# Altium PCB PCB_Main_Board_v2.0.PcbDoc (part 4 of 5)
Units mil, origin at the board's own origin, x right, y up, seen from the top; angles counter-clockwise.
Board outline 1967.5 x 1574.8 mil, 4 copper layers (Top Layer, Mid Layer 1, Mid Layer 2, Bottom Layer), stack 61.811 mil thick; 225 components, 129 nets, 854 pads, 286 vias.
Unrouted connection lines stored in the file: 2.
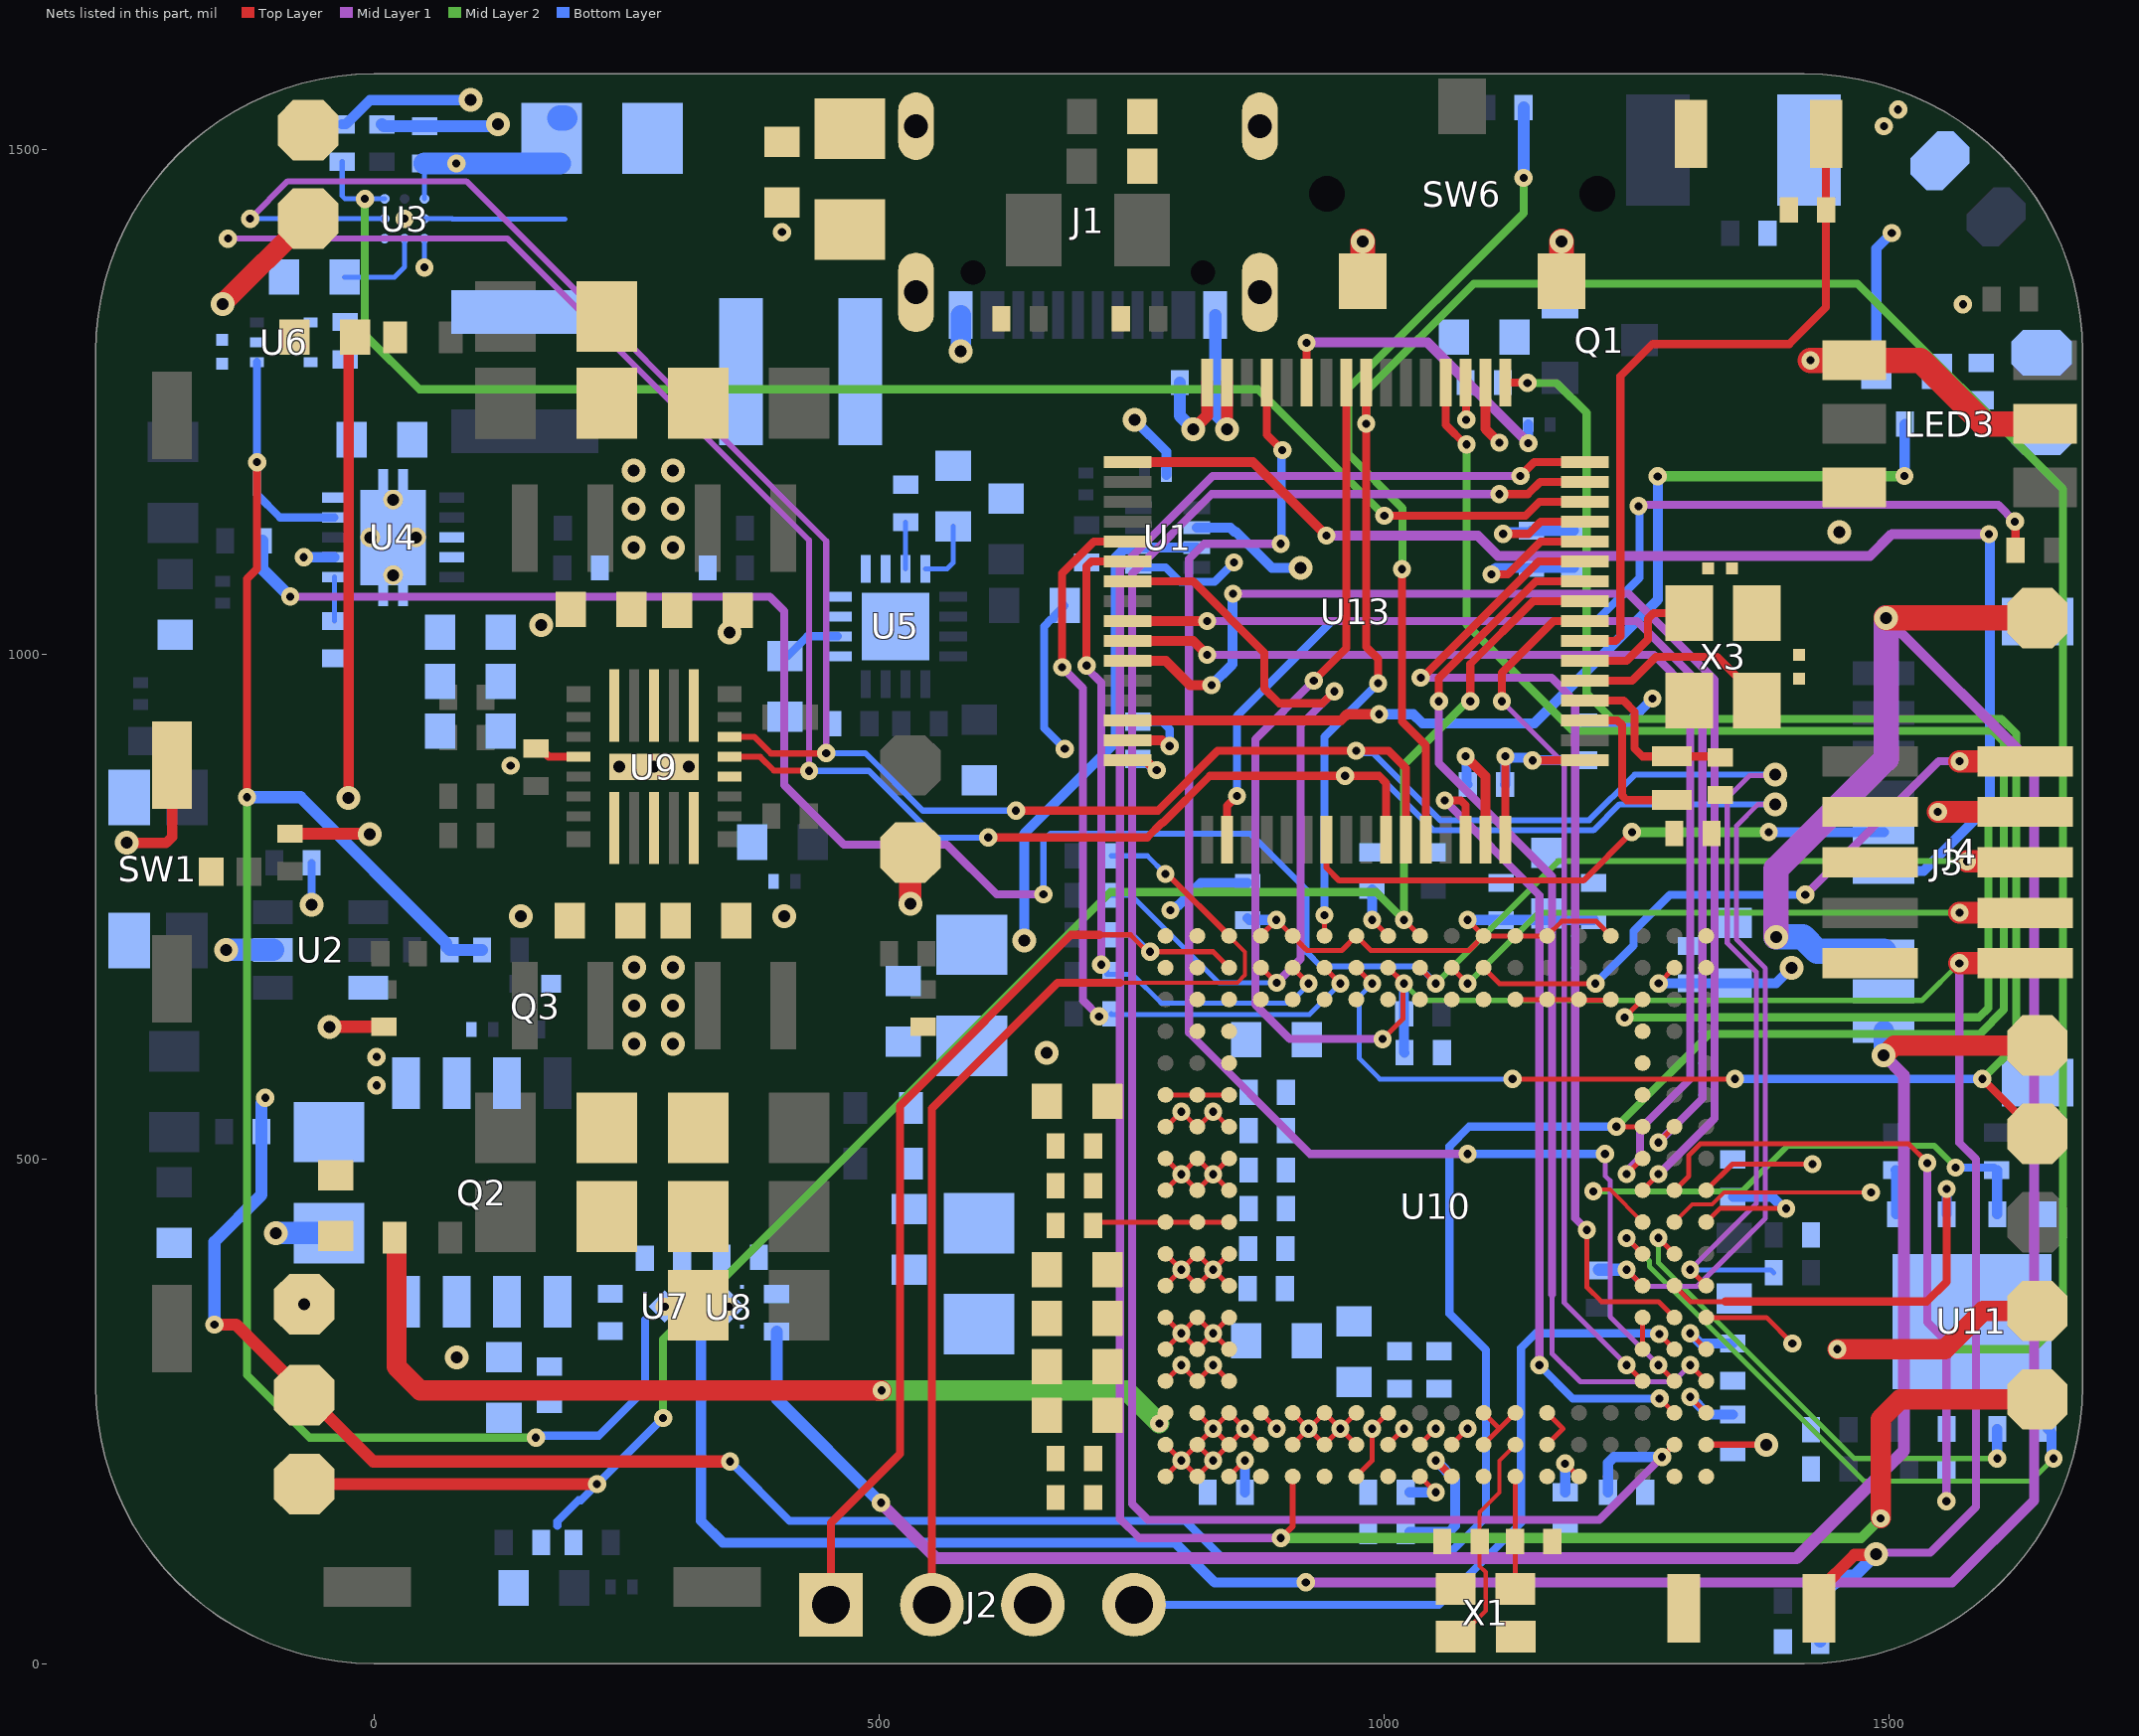
[diagram p4: the nets of this part, all layers, seen from the top]

## Via types
v1: diameter 18, hole 8, Top Layer to Bottom Layer, tented both sides, 224 vias
v2: diameter 23.62, hole 11.81, Top Layer to Bottom Layer, tented both sides, 59 vias
v3: diameter 19.68, hole 11.81, Top Layer to Bottom Layer, tented both sides, 3 vias

## Nets (pads, with @x,y where several pads share a name; then routed paths per layer and width w, separated by ;. In a path a pad name is that pad's centre, name@x,y a point inside that pad or via, vN(x,y) a via of type N, cw(c..) or ccw(c..) an arc to the next point about the centre after c; other vN are vias at no path point) (continued)
AR_1P0_RF1: C24.2 C25.2 C61.2 C62.2 C63.2 C64.2 FB3.2 U10.J16 U10.J17 U10.J18 | length 136.1
  Top Layer w5: C64.2@711.97,434.26 715.22,437.51 U10.J18@783.75,437.51 U10.J17@815.24,437.51 U10.J16@846.74,437.51
  other v2: 665.94,604.99
AR_1P0_RF2: C31.2 C32.2 C55.2 C56.2 C57.2 C65.2 C66.2 C67.2 C68.2 FB4.2 U10.G16 U10.G17 U10.G18 U10.H16 U10.H17 U10.H18 | length 178.2
  Top Layer w5: U10.G18@783.75,374.52 v1(799.5,390.27) ; U10.H18@783.75,406.01 v1(799.5,390.27) ; U10.G16@846.74,374.52 v1(830.99,390.27) ; U10.H16@846.74,406.01 v1(830.99,390.27) ; v1(799.5,390.27) U10.H17@815.24,406.01 v1(830.99,390.27) ; v1(799.5,390.27) U10.G17@815.24,374.52 v1(830.99,390.27)
AR_1P2: C30.2 C79.2 C80.2 C81.2 C82.2 C83.2 C84.2 C85.2 C86.2 FB5.2 U10.A5 U10.C1 U10.E1 U10.J1 U10.V4 U10.V6 U10.V7 U10.V8 U10.V12 U10.V14 U10.V15 | length 1358.9
  Top Layer w5: U10.V15@878.24,720.98 878.24,721.21 893.52,736.49 v1(893.52,736.72) 893.75,736.72 923.87,706.6 958.35,706.6 U10.V12@972.72,720.98 987.1,706.6 1084.34,706.6 U10.V8@1098.71,720.98 U10.V7@1130.2,720.98 U10.V6@1161.7,720.98 1176.08,735.35 1210.32,735.35 U10.V4@1224.69,720.98 ; v1(1082.96,736.72) U10.V8@1097.49,722.2 ; v1(1179.5,198.25) 1179.99,198.25 1192.71,185.54 U10.A5@1193.2,185.54 ; v1(1303.43,264.28) U10.C1@1319.18,248.53 ; v1(1303.43,327.28) U10.E1@1319.18,311.53 ; U10.J1@1319.18,437.51 1319.33,437.51 1332.7,450.89 v1(1398.22,450.89)
  Top Layer w10: v2(-25.2,857.49) -25.2,1307.56 C30.2@-18.76,1314
  Bottom Layer w10: C83.2@865,738.5 866.78,736.72 v1(893.52,736.72) ; v1(1082.96,736.72) C79.2@1207.84,736.72 ; C86.2@1179.5,169.8 v1(1179.5,198.25) ; v1(1303.43,264.28) 1320.93,246.79 C85.2@1345.5,246.79 ; v1(1303.43,327.28) 1313.43,317.28 C84.2@1345.5,317.28 ; C80.2@1345.5,462.5 1384.44,462.5 1396.06,450.89 v1(1398.22,450.89)
AR_1V4_APLL: C58.2 U10.A10 | length 48.3
  Top Layer w5: U10.A10@1035.72,185.54 v1(1051.46,169.8)
  Bottom Layer w10: C58.2@1025.47,169.8 v1(1051.46,169.8)
AR_1V4_SYNTH: C60.2 U10.A9 | length 142.2
  Top Layer w8: v1(1051.47,201.29) U10.A9@1067.21,185.54
  Bottom Layer w10: C60.2@1025.47,130.79 1064.6,130.79 1070.46,136.65 1070.46,182.3 v1(1051.47,201.29)
AR_1V8: C22.2 C23.2 C69.2 C70.2 C71.2 C72.2 C73.2 C74.2 C75.2 C76.2 C77.2 C78.2 C90.2 C91.2 C92.2 FB2.2 U10.A12 U10.B1 U10.C11 U10.C15 U10.C18 U10.F1 U10.K1 U10.M16 U10.M17 U10.M18 U10.U2 U10.V11 | length 1648.1
  Top Layer w5: C73.2@726.47,246.26 C73.2@728.74,248.54 ; v1(777.61,238.04) 777.61,240.22 783.75,246.35 U10.C18@783.75,248.53 ; U10.M18@783.75,532 784.69,532 v1(799.5,546.75) v1(799.5,546.75) 799.55,546.75 814.3,532 U10.M17@815.24,532 ; U10.M17@816.19,532 v1(830.99,546.75) ; v1@831.05,546.75 U10.M16@845.8,532 ; U10.C15@878.24,248.53 v1(893.98,232.79) ; U10.A12@972.72,185.54 988.47,201.29 v1(988.47,232.79) U10.C11@1004.22,248.53 ; v1(988.47,736.72) U10.V11@1004.22,720.98 ; v1@1271.94,673.73 v1(1272.07,673.87) U10.U2@1287.68,689.48 ; U10.F1@1319.18,343.02 1378.76,343.02 v1(1404.5,317.28) ; U10.K1@1319.18,469.01 1345.11,494.94 v1(1424.47,494.94)
  Top Layer w6: U10.B1@1319.18,217.04 v2(1378.76,217.04)
  Top Layer w20: FB2.2@20.44,422 22.25,420.19 22.25,294.25 45.77,270.73 v1(502.73,270.73)
  Mid Layer 2 w20: v1@498.73,270.73 744.92,270.73 v1(777.61,238.04)
  Bottom Layer w10: C91.2@988.22,766.78 988.47,766.53 v1(988.47,736.72) ; v1@1272.21,674 C92.2@1303.43,674 C90.2@1347,674 1388.37,674 v2(1403.85,689.48)
  Bottom Layer w22: v2(-97.14,426.64) C22.2@-44.5,426.64
AR_BSS_LOGGER: U10.D3 U13.8 | length 862.8
  Top Layer w5: v1(1240.44,295.78) U10.D3@1256.19,280.03
  Top Layer w8: v1(1116.79,953.35) 1116.79,981.68 1167.88,1032.77 U13.8@1199,1032.77
  Mid Layer 1 w5: v1(1116.79,953.35) 1178.63,891.51 1178.63,357.6 v1(1240.44,295.78)
AR_CS1: U10.C2 U13.62 | length 810.5
  Top Layer w5: v1@1271.29,264.28 1272.79,262.78 1273.12,262.78 1287.36,248.54 U10.C2@1287.68,248.53
  Top Layer w8: v1(1060.21,855.1) 1076.2,855.1 1080.89,850.41 U13.62@1080.89,816.24
  Mid Layer 1 w8: v1(1060.21,855.1) 1154,761.3 v1(1154,295.78)
  Bottom Layer w8: v1(1154,295.78) 1187,262.78 v1(1272.95,262.78)
AR_HOSTINTR1: R37.1 U10.B2 U13.15 | length 2071.8
  Top Layer w5: v1(1275.42,204.77) U10.B2@1287.68,217.04 U10.B2@1291.17,220.52
  Top Layer w8: v1(1114.35,1158.47) 1142.6,1158.47 1154.7,1170.57 U13.15@1199,1170.57
  Mid Layer 1 w8: v1(1114.35,1158.47) 829.35,1158.47 750.57,1079.69 750.57,712.68 750.57,158.45 766.47,142.55 1213.2,142.55 v1(1275.42,204.77)
  Bottom Layer w10: R37.1@1221.94,169.8 1221.94,198.91 1227.8,204.77 v1(1275.42,204.77)
AR_MCUCLKOUT: TP15.1 U10.V13 U13.24 | length 2697.3
  Top Layer w5: U10.V13@941.23,720.98 v1(941.23,741.5)
  Top Layer w8: U13.24@982.47,1268.99 v1(982.47,1228.26) 982.47,1007.18 994.19,995.46 v1(994.19,971.1)
  Top Layer w20: v1(1449,311.53) 1555.53,311.53 1593.48,349.48 TP15.1@1647.09,349.48
  Mid Layer 2 w8: v1(982.47,1228.26) 982.47,1260.47 1089,1367 1468.95,1367 1672.31,1163.64 1672.31,340.79 1643.05,311.53 v1(1449,311.53)
  Bottom Layer w8: v1(941.23,741.5) 941.23,918.14 v1(994.19,971.1)
AR_MISO1: U10.D1 U13.10 | length 1077.2
  Top Layer w5: v1(1303.43,295.78) U10.D1@1319.18,280.03
  Top Layer w8: v1(1054.44,953.35) 1054.44,976.05 1150.53,1072.14 U13.10@1199,1072.14
  Mid Layer 1 w5: 1166.63,366.08 1166.63,307.14 1194.48,279.28 1286.93,279.28 v1(1303.43,295.78)
  Mid Layer 1 w8: v1(1054.44,953.35) 1054.44,891.99 1166.63,779.81 1166.63,366.08
AR_MOSI1: U10.F2 U13.11 | length 1057
  Top Layer w5: v1(1201.07,429.64) 1201.07,373.08 1215.38,358.77 1271.94,358.77 U10.F2@1287.68,343.02
  Top Layer w8: v1(1036.45,976.67) 1038.1,976.67 1153.25,1091.83 U13.11@1199,1091.83
  Mid Layer 1 w8: v1(1036.45,976.67) 1165.93,976.68 1189.43,953.19 1189.43,441.28 v1(1201.07,429.64)
AR_MSS_LOGGER: J2.4 U10.E2 | length 754.8
  Top Layer w5: v1@1272.51,327.28 1272.69,327.1 v1(1272.69,326.52) U10.E2@1287.68,311.53
  Bottom Layer w8: J2.4@752.5,58.4 1054.6,58.4 1135.77,139.58 1135.77,312.71 1150.34,327.28 v1@1272.51,327.28
AR_NERR_OUT: R32.1 U10.U15 U13.39 | length 814.7
  Top Layer w5: U10.U15@878.24,689.48 878.52,689.48 893.52,674.48 v1(893.81,674.48)
  Top Layer w8: U13.39@746.04,1071.94 U13.39@746.24,1072.14 811.07,1072.14 881.76,1001.45 881.76,965.96 896.42,951.3 939.16,951.3 v1(951.03,963.17)
  Mid Layer 1 w8: v1(893.81,674.48) 917.5,698.18 917.5,929.65 v1(951.03,963.17)
  Bottom Layer w5: R32.1@730,761.15 749.96,761.15 836.63,674.48 v1(893.81,674.48)
AR_NERRIN: R30.1 U10.U14 U13.38 | length 700.1
  Top Layer w5: U10.U14@909.73,689.48 v1(925.48,673.73) v1@925.98,673.23
  Top Layer w8: v1@705.5,988.87 705.5,1087.14 710.19,1091.83 U13.38@746.24,1091.83
  Mid Layer 1 w8: v1(705.62,988.75) 705.62,986.04 720,971.66 v1(720,692.48)
  Bottom Layer w5: v1(720,692.48) 723.5,692.48 725.44,690.54 725.44,682.88 750.98,682.88 779.35,654.5 907.25,654.5 v1@925.98,673.23
AR_NRST: C46.2 C47.2 J3.10 R28.1 R31.1 SW2.2 U10.U11 U13.25 | length 3071
  Top Layer w5: v1(998.79,618.78) 1018.79,638.78 v1@1018.79,674.91 ; U10.U11@1004.22,689.48 v1@1018.79,674.91 ; v1(1019.97,673.73) v1@1018.79,674.91 ; SW2.2@1430.93,41.78 SW2.2@1430.93,55 ; v1(1569.79,693.85) v1@1570,693.85
  Top Layer w8: v1(930.58,973.72) 962.78,1005.91 U13.25@962.78,1268.99
  Top Layer w12: SW2.2@1430.93,55 1430.93,72.72 1465.99,107.78 1486.6,107.78 v2(1487.36,108.53)
  Top Layer w22: v1@1570,693.85 J3.10@1634.83,693.85
  Mid Layer 1 w8: v1(930.58,973.72) 872.61,915.74 872.61,652.95 906.79,618.78 v1(998.79,618.78) ; v2(1487.36,108.53) 1488.82,110 1541,110 1586.17,155.17 1586.17,499.82 1569.79,516.2 v1(1569.79,693.85)
  Mid Layer 2 w4: v1(1019.97,673.73) 1035.97,657.73 1533.67,657.73 1533.88,657.73 v1@1570,693.85
  Mid Layer 2 w5: v1@1019.79,673.78 1036.79,656.78 1532.72,656.78 1533.67,657.73 v1(1569.79,693.85)
  Bottom Layer w5: v1@1019.79,673.78 1019.97,673.6 1020.17,673.4 R28.1@1020.17,643.64
  Bottom Layer w10: v1(1019.97,673.73) 1019.97,673.6 1019.97,605.69 C46.2@1020.46,605.2
  Bottom Layer w12: C47.2@1432,22 1432,61.47 1435,64.47 1435,68.5 1453.85,87.35 1466.17,87.35 v2(1487.36,108.53)
AR_OSC_CLKOUT: TP11.1 U10.A14 U13.16 | length 2541.9
  Top Layer w6: v1(898,124.55) 909.73,136.28 U10.A14@909.73,185.54
  Top Layer w8: v1(1135.15,1176.47) 1148.8,1190.13 1198.87,1190.13 U13.16@1199,1190.25
  Top Layer w20: v1(1492,144) 1492,242.48 1511.37,261.85 TP11.1@1647.09,261.85
  Mid Layer 1 w8: v1(898,124.55) 757.8,124.55 738.57,143.78 738.57,1084.66 830.38,1176.47 v1(1135.15,1176.47)
  Mid Layer 2 w10: v1(898,124.55) 1472.55,124.55 v1(1492,144)
AR_PMIC_CLKOUT: R44.1 R45.2 TP14.1 U10.V10 U13.9 | length 1890
  Top Layer w5: v1(1019.97,736.72) U10.V10@1035.72,720.98
  Top Layer w8: v1(1085.52,953.35) 1085.52,990.16 1147.82,1052.46 U13.9@1199,1052.46
  Top Layer w12: TP14.1@-69,178 v1@222.14,178
  Mid Layer 2 w8: v1(286.29,243.49) 286.29,321.42 729.14,764.28 992.41,764.28 v1(1019.97,736.72) 1019.97,890.45 1082.52,953 v1@1082.52,953.35
  Bottom Layer w8: 181.5,136.75 181.5,141 202.5,162 204.8,162 v1(286.29,243.49)
  other v1: 220.8,178
AR_QSPI_CLK: U10.H2 U11.6 | length 491.9
  Top Layer w5: v1(1271.94,421.76) U10.H2@1287.68,406.01
  Mid Layer 2 w5: v1(1271.94,421.76) 1271.94,397.09 1465.72,203.31 v1(1607.31,203.31)
  Bottom Layer w10: v1(1607.31,203.31) U11.6@1607.31,232.63
AR_QSPI_CS: R42.1 U10.J2 U11.1 | length 251.3
  Top Layer w4: U10.J2@1287.68,437.51 1305.31,455.13 1324.93,455.13 1336.68,466.89 v1(1482.31,466.89)
  Bottom Layer w10: R42.1@1506.64,489.08 1507.31,489.08 U11.1@1507.31,445.23
AR_QSPI_D0: U10.H3 U11.5 | length 588.7
  Top Layer w5: v1(1240.43,421.55) 1240.54,421.55 1256.07,406.02 U10.H3@1256.19,406.01
  Mid Layer 2 w5: v1(1240.43,421.55) 1262.94,399.04 1262.94,393.36 1475.3,181 1640.69,181 v1(1663,203.31)
  Bottom Layer w10: U11.5@1657.31,232.63 1661.17,228.77 1661.17,207.31 1663,205.47 v1(1663,203.31)
AR_QSPI_D1: U10.G2 U11.2 | length 401.3
  Top Layer w5: U10.G2@1287.68,374.52 1303.43,358.77 1338,358.77
  Top Layer w8: 1338,358.77 1537.77,358.77 1557.31,378.31 v1(1557.31,470.31)
  Bottom Layer w10: U11.2@1557.31,445.23 v1(1557.31,470.31)
AR_QSPI_D2: R41.1 U10.J3 U11.3 | length 534.7
  Top Layer w4: v1@1207.43,469.99 1207.72,469.7 1224,469.7 U10.J3@1256.19,437.51
  Mid Layer 2 w6: v1(1207.43,467.99) 1354.66,467.99 1399.67,513 1545.04,513 1566.17,491.88 v1(1566.17,491.54)
  Bottom Layer w4: R41.1@1604.33,491.54 R41.1@1606.78,489.08
  Bottom Layer w8: v1(1566.17,491.54) R41.1@1604.33,491.54
  Bottom Layer w10: R41.1@1606.78,489.08 1607.31,489.08 U11.3@1607.31,445.23
AR_QSPI_D3: R40.1 U10.K2 U11.7 | length 632.5
  Top Layer w5: U10.K2@1287.68,469.01 1288.04,469.01 1302.06,483.03 1302.06,503.71 1313.23,514.88 1519.76,514.88 1538,496.63 v1(1538,496)
  Mid Layer 1 w8: v1(1538,496) 1538,338.32 1557,319.32 v1(1557,161)
AR_RS232RX: J2.2 R35.1 U10.V16 | length 1050.8
  Top Layer w4: 738.57,674.48 854.82,674.48 862.49,682.15 862.49,705.23 U10.V16@846.74,720.98
  Top Layer w6: v1(783.75,782.28) 785.44,782.28 U10.V16@846.74,720.98
  Top Layer w8: J2.2@552.5,58.91 552.5,550.09 676.9,674.48 738.57,674.48
  Bottom Layer w5: R35.1@730,800.28 765.75,800.28 v1(783.75,782.28)
AR_RS232TX: J2.1 R36.1 U10.U16 | length 979.1
  Top Layer w5: 718.41,722 749,722 765.77,705.23 v1(768.57,705.23) ; v1@767,705.25 830.97,705.25 U10.U16@846.74,689.48
  Top Layer w8: J2.1@452.5,58.4 452.5,139.5 520.93,207.93 520.93,552.66 690.27,722 718.41,722
  Bottom Layer w5: R36.1@730,722 751.75,722 v1@768.52,705.23
AR_SCL: R33.1 U3.A3 U9.5 U10.G3 U13.58 | length 2979.6
  Top Layer w5: v1(1240.44,390.27) U10.G3@1256.19,374.52
  Top Layer w6: U9.5@352.01,898.25 382.32,898.25 395.91,884.67 430.51,884.67 v1(430.81,884.37)
  Top Layer w8: v1(608.22,818.41) 765.71,818.41 780.31,833.01 781.2,833.01 827.67,879.48 v1(961.55,879.48) 995.17,879.48 1002.15,872.5 U13.58@1002.15,816.24
  Mid Layer 1 w5: v1(1240.44,390.27) 1256.94,373.77 1310.27,373.77 1377.8,441.3 1377.8,688.86 1349,717.67 1349,829.81 1370.52,851.33 v2(1387.71,851.33)
  Mid Layer 1 w6: v1(-144.61,1411.59) 132.15,1411.59 430.81,1112.93 v1(430.81,884.37)
  Bottom Layer w5: v1(-144.61,1411.59) U3.A3@10.59,1411.59
  Bottom Layer w6: v1(430.81,884.37) 489.9,884.37 555.86,818.41 v1(608.22,818.41) ; v1(961.55,879.48) 995.17,879.48 1049.14,825.51 1207.46,825.51 1233.28,851.33 v2(1387.71,851.33)
  Bottom Layer w12: R33.1@1213.08,390.27 v1(1240.44,390.27)
AR_SDA: R34.1 U3.A2 U9.6 U10.G1 U13.59 | length 3012.9
  Top Layer w4: U13.59@1021.84,816.24 1019.97,818.1 U13.59@1021.84,819.97
  Top Layer w5: v1(1303.43,390.27) U10.G1@1319.18,374.52
  Top Layer w6: U9.6@352.01,917.94 376.78,917.94 393.05,901.67 447.46,901.67 v1(447.81,902.02)
  Top Layer w8: v1(635.66,845.01) 776.23,845.01 835.45,904.23 v1(972.45,904.23) 1004.81,904.23 1021.84,887.2 U13.59@1021.84,819.97
  Mid Layer 1 w5: v1(1303.43,390.27) 1368.8,455.64 1368.8,685.14 1340,713.94 1340,857.56 1362.12,879.68 v2@1387.71,879.68
  Mid Layer 1 w6: v1(-122.68,1431.28) -85.49,1468.46 91.35,1468.46 447.81,1112 v1(447.81,902.02)
  Bottom Layer w5: v1(-122.68,1431.28) U3.A2@10.59,1431.28 ; v1(1303.43,390.27) 1383,390.27 R34.1@1386,387.27
  Bottom Layer w6: v1(447.81,902.02) 486.39,902.02 543.4,845.01 v1(635.66,845.01) ; v1(972.45,904.23) 974.75,901.94 989.32,901.94 1055.75,835.51 1203.32,835.51 1248.49,880.68 v2(1387.71,880.68)
AR_SPICLK1: U10.D2 U13.29 | length 1448.3
  Top Layer w5: v1(1271.94,295.78) U10.D2@1287.68,280.03
  Top Layer w8: U13.29@884.04,1268.99 884.04,1217.48 v1(899.42,1202.11)
  Mid Layer 1 w5: v1(1219,505) 1219,483.33 1223.93,478.4 1223.93,343.79 v1(1271.94,295.78)
  Mid Layer 1 w8: v1(897.82,1109.26) 821.89,1109.26 806.98,1094.36 806.98,625.01 927,505 v1(1082.96,505)
  Bottom Layer w8: v1(897.82,1109.26) 898.62,1110.06 898.62,1201.31 v1(899.42,1202.11) ; v1(1082.96,505) v1(1219,505)
AR_SYNC_IN: TP12.1 U10.U12 U13.17 | length 1974.5
  Top Layer w5: U10.U12@972.72,689.48 v1(988.47,673.73) ; v1@1125.58,579.24 v1(1347.69,579.24) ; v1@1141.8,1268.99 v1(1142.15,1268.64)
  Top Layer w8: U13.17@1120.26,1268.99 v1@1141.8,1268.99 ; v1(1592.58,579.24) TP12.1@1647.09,524.73
  Mid Layer 2 w8: v1(1142.15,1268.64) 1171.03,1268.64 1200.79,1238.89 1200.79,960.9 1225.81,935.88 1611.43,935.88 1626,921.31 1626,612.66 v1(1592.58,579.24)
  Bottom Layer w5: v1(988.47,673.73) 975.72,660.98 975.72,599.51 995.98,579.24 v1(1127.43,579.24)
  Bottom Layer w8: v1(1347.69,579.24) v1(1592.58,579.24)
AR_SYNC_OUT: R49.2 TP13.1 U10.M3 U13.20 | length 3724.7
  Top Layer w5: v1(1230.26,532) U10.M3@1256.19,532
  Top Layer w8: U13.20@1061.21,1268.99 1061.21,1227.12 1080.65,1207.69 v1(1081.79,1207.69)
  Top Layer w12: v1(-158,336) -136.5,336 -0.9,200.4 v1(352.51,200.4)
  Mid Layer 2 w8: v1(1081.79,1207.69) 1081.79,1029.24 1187.15,923.88 1603.03,923.88 1614,912.91 1614,647.88 1590.12,624 1322.26,624 v1(1230.26,532)
  Bottom Layer w8: v1(352.51,200.4) 411.41,141.5 803.33,141.5 840.28,104.55 1060.28,104.55 1100.96,145.24 1100.96,310.85 1064.96,346.85 1064.96,512.46 1084.51,532 v1(1230.26,532)
  Bottom Layer w12: v1(-158,336) -158,417.93 -111.5,464.43 R49.2@-111.5,527 -111.5,555.28 -107.76,559.02 v1(-107.76,560.64)
AR_TCK: J3.4 U10.T3 | length 719.2
  Top Layer w5: v1(1238.44,640.24) U10.T3@1256.19,657.98
  Top Layer w22: v1(1548.53,843.85) J3.4@1634.83,843.85
  Mid Layer 2 w5: 1323.65,640.24 1323.69,640.28
  Mid Layer 2 w8: v1(1238.44,640.24) 1323.65,640.24 ; 1323.69,640.28 1589.43,640.28 1598.65,649.5 1598.65,834.07 1588.88,843.85 v1(1548.53,843.85) v1@1543.53,843.85
AR_TDI: J3.8 U10.U9 | length 603.3
  Top Layer w5: U10.U9@1067.21,689.48 v1(1082.96,673.73)
  Top Layer w22: v1(1570,743.85) J3.8@1634.83,743.85
  Mid Layer 2 w6: v1(1082.96,673.73) 1153.08,743.85 1410.14,743.85 1410.27,743.72 ; 1410.27,743.85 1424.35,743.85 ; 1424.35,743.72 1424.48,743.85 v1(1570,743.85)
AR_TDO_SOP0: J3.6 R55.2 U10.U10 | length 2234.4
  Top Layer w5: U10.U10@1035.72,689.48 v1(1051.47,673.73)
  Top Layer w22: v1(1577.4,794.89) 1633.79,794.89 J3.6@1634.83,793.85
  Mid Layer 1 w8: v1(-83,1057) 391.99,1057 406.31,1042.68 406.31,870.43 465.26,811.49 567.29,811.49 616.58,762.2 v1(662.81,762.2)
  Mid Layer 2 w6: v1(1051.47,673.73) 1172.62,794.89 v1(1577.4,794.89)
  Bottom Layer w6: v1(662.81,762.2) 662.81,815.17 669.96,822.32 867.63,822.32 923.47,766.48 923.47,704.63 937.36,690.73 993.85,690.73 993.9,690.78 1034.42,690.78 v1(1051.47,673.73)
  Bottom Layer w12: R55.2@-110.43,1112.41 -110.43,1084.1 -83.33,1057 v1(-83,1057)
AR_TMS: J3.2 U10.U8 | length 641.4
  Top Layer w5: U10.U8@1098.71,689.48 1114.46,673.73 v1(1209.51,673.73)
  Top Layer w22: v1(1570,893.85) J3.2@1634.83,893.85
  Mid Layer 1 w8: v1@1417.86,762.28 1549.43,893.85 v1(1570,893.85)
  Bottom Layer w8: v1(1209.51,673.73) 1247.36,711.58 1247.36,725.79 1283.29,761.72 v1(1417.31,761.72)
AR_VBGAP: C59.2 U10.A16 | length 53.8
  Top Layer w5: U10.A16@846.74,185.54 v1(862.49,201.29)
  Bottom Layer w10: C59.2@862.49,169.8 v1(862.49,201.29)
AR_WARMRST: R29.1 U10.U13 U13.37 | length 794.7
  Top Layer w5: U10.U13@941.23,689.48 v1(956.98,673.73)
  Top Layer w8: v1(681.41,986.93) 681.41,1080.18 712.74,1111.51 U13.37@746.24,1111.51
  Mid Layer 1 w8: v1(681.41,986.93) 702,966.34 702,657.17 v1(718,641.17)
  Bottom Layer w5: R29.1@730,643.74 730,642.98 926.23,642.98 v1(956.98,673.73)
AR_XTAL_N: C49.2 U10.B7 X1.3 | length 221.9
  Top Layer w4: X1.3@1071.3,26.86 1075.24,26.86 1100.83,52.46 1100.83,90.78 1094.8,96.81 C49.2@1094.8,121.1 1094.8,150.14 1114.46,169.8 1114.46,201.29 U10.B7@1130.2,217.04
AR_XTAL_P: C48.2 U10.A7 X1.1 | length 111.5
  Top Layer w5: U10.A7@1130.2,185.54 1130.21,121.1 1130.21,74.26 X1.1@1130.36,74.11
BAT+: C5.2 C11.1 C14.2 L1.1 L2.2 R7.2 U3.C2 U4.10 U5.10 U6.5 | length 199.9
  Bottom Layer w5: U3.C2@49.96,1431.28 77.5,1431.28 77.5,1431 189,1431
  Bottom Layer w8: C14.2@406.95,998.03 409.45,998.03 429.13,1017.71 U5.10@459.34,1017.71
BATT: C4.1 C54.2 C99.1 R7.1 TP1.1 TP4.1 U3.C1 U3.C3 | length 202.6
  Bottom Layer w5: v1(49.96,1383) U3.C3@49.96,1411.59 ; U3.C1@49.96,1450.96 C4.1@50,1486
  Bottom Layer w22: C4.1@50,1486 v1(81.5,1486) R7.1@184,1486
  Bottom Layer w25: R7.1@184,1531 R7.1@189,1531
  other v1: 1573.38,1346.5
BLUE: R59.2 U13.46 | length 1000.5
  Top Layer w10: U13.46@746.24,934.35 957.43,934.35 963.64,940.56 v1(995.32,940.56)
  Mid Layer 2 w10: v1(1271.14,1176.14) 1271.31,1176.3 1515.36,1176.3 v1(1515.53,1176.47)
  Bottom Layer w10: v1(995.32,940.56) 1029.1,940.56 1038.1,931.56 1148.99,931.56 1271.22,1053.79 v1(1271.14,1176.14) ; v1(1515.53,1176.47) 1515.71,1176.65 1515.71,1227.82 R59.2@1515.89,1228
BOOT0: R58.2 U13.60 | length 829.7
  Top Layer w8: v1(1017.91,1084.21) 1017.91,933.41 1041.52,909.81 U13.60@1041.52,816.24
  Mid Layer 2 w8: v1(1017.91,1084.21) 1018.47,1084.76 1018.47,1144.56 964.47,1198.56 964.47,1262.96 1138.35,1436.84 v1(1138.35,1471.82)
  Bottom Layer w12: v1(1138.35,1471.82) R58.2@1138.35,1541.52
ENABLE_RADAR: J4.6 U13.33 | length 1302.2
  Top Layer w10: U13.33@746.24,1190.25 870.26,1190.25 v1(943.1,1117.42)
  Mid Layer 1 w10: v1(943.1,1117.42) 1092.88,1117.42 1113.11,1097.19 1481.19,1097.19 1503,1119 v1@1600.06,1119
  Bottom Layer w10: J4.6@1495,784.4 1495.97,785.37 1534.65,785.37 1600.06,850.78 v1@1600.06,1119
  other v1: 1599.06,1119
GND: C1.2 C2.1 C3.1 C4.2 C5.1 C6.1 C7.1 C8.1 C9.1 C10.1 C11.2 C12.2 C14.1 C15.2 C16.1 C17.2 C18.2 C19.1 C20.1 C21.1 C22.1 C23.1 C24.1 C25.1 C26.1 C27.1 C28.1 C29.1 C30.1 C31.1 C32.1 C33.2 C34.1 C35.1 C36.1 C37.1 C38.1 C39.1 C40.1 C41.1 C42.1 C43.1 C44.1 C45.1 C46.1 C47.1 C48.1 C49.1 C50.1 C51.1 C52.1 C53.2 C54.1 C55.1 C56.1 C57.1 C58.1 C59.1 C60.1 C61.1 C62.1 C63.1 C64.1 C65.1 C66.1 C67.1 C68.1 C69.1 C70.1 C71.1 C72.1 C73.1 C74.1 C75.1 C76.1 C77.1 C78.1 C79.1 C80.1 C81.1 C82.1 C83.1 C84.1 C85.1 C86.1 C87.1 C88.1 C89.1 C90.1 C91.1 C92.1 C93.2 C94.2 C95.1 C96.1 C97.1 C98.1 C99.2 C100.1 C101.1 C102.2 C103.1 C104.1 C105.1 C106.1 C109.1 J1.A1/B12 J1.B1/A12 J2.3 J3.3 J3.5 J3.9 J4.9 J4.MP1 J4.MP2 LED1.2 Q1.2 Q3.2 R1.1 R4.1 R5.1 R6.1 R9.1 R13.1 R14.1 R17.1 R37.2 R43.1 R47.1 R50.1 R57.1 SW1.2 SW2.1 SW5.2 SW6.1 SW7.2 TP1.2 U1.1 U2.2 U3.B2 U4.11 U5.9 U5.11 U5.12 U5.17 U6.2 U6.4 U7.2 U7.5 U8.2 U8.5 U9.4 U9.11 U9.17 U9.24 U9.27 U10.A1 U10.A2 U10.A6 U10.A8 U10.A11 U10.A13 U10.A15 U10.A17 U10.A18 U10.B6 U10.B8 U10.B9 U10.B10 U10.B11 U10.B12 U10.B13 U10.B14 U10.B15 U10.B16 U10.B17 U10.B18 U10.C6 U10.C7 U10.C8 U10.C12 U10.C13 U10.C14 U10.C16 U10.C17 U10.D16 U10.D17 U10.D18 U10.E3 U10.E16 U10.E17 U10.E18 U10.F3 U10.F16 U10.F17 U10.F18 U10.K16 U10.K17 U10.K18 U10.L16 U10.L17 U10.L18 U10.N3 U10.N16 U10.N17 U10.N18 U10.P3 U10.P16 U10.R3 U10.R16 U10.R17 U10.T4 U10.T5 U10.T6 U10.T7 U10.T8 U10.T9 U10.T10 U10.T11 U10.T12 U10.T13 U10.T14 U10.T15 U10.T16 U10.T17 U10.U1 U10.U17 U10.U18 U10.V1 U10.V17 U10.V18 U11.4 U11.9 U13.12 U13.18 U13.31 U13.47 U13.63 X1.2 X1.4 X3.2 X3.4 | length 3079.4
  Top Layer w5: U10.A18@783.75,185.54 v1(799.5,201.29) ; U10.B18@783.75,217.04 v1(799.5,201.29) ; U10.D18@783.75,280.03 v1(799.5,295.78) U10.D17@815.24,280.03 v1(830.99,295.78) U10.D16@846.74,280.03 ; U10.E18@783.75,311.53 v1(799.5,327.28) ; U10.F18@783.75,343.02 v1(799.5,327.28) ; U10.K18@783.75,469.01 v1(799.5,484.76) ; U10.L18@783.75,500.5 v1(799.5,484.76) ; U10.N18@783.75,563.5 U10.N16@846.74,563.5 ; U10.C17@815.24,248.53 v1(830.99,232.79) ; U10.E16@846.74,311.53 v1(830.99,327.28) ; U10.F16@846.74,343.02 v1(830.99,327.28) ; U10.K16@846.74,469.01 v1(830.99,484.76) ; U10.L16@846.74,500.5 v1(830.99,484.76) ; U10.B15@878.24,217.04 v1(862.49,232.79) ; U10.B14@909.73,217.04 v1(925.48,232.79) ; U10.C14@909.73,248.53 v1(925.48,232.79) ; U10.B12@972.72,217.04 v1(956.98,232.79) ; U10.C12@972.72,248.53 v1(956.98,232.79) ; U10.B11@1004.22,217.04 v1(1019.97,232.79) ; U10.B10@1035.72,217.04 v1(1051.47,232.79) ; U10.B9@1067.21,217.04 v1(1082.96,232.79) ; U10.B8@1098.71,217.04 1114.46,232.79 ; U10.C8@1098.71,248.53 1114.46,232.79 ; U10.C7@1130.2,248.53 1114.46,232.79 ; U10.T7@1130.2,657.98 1130.21,657.73 1161.45,657.73 U10.T6@1161.7,657.98 1192.95,657.98 1193.7,657.23 1224.19,657.23 U10.T4@1224.69,657.73 ; U10.B6@1161.7,217.04 1177.45,232.79 U10.C6@1161.7,248.53 ; U10.E3@1256.19,311.53 U10.F3@1256.19,343.02 ; v1(799.5,201.29) U10.A17@815.24,185.54 v1(830.99,201.29) ; v1(799.5,201.29) U10.B17@815.24,217.04 ; v1(799.5,327.28) U10.F17@815.24,343.02 v1(830.99,327.28) ; v1(799.5,327.28) U10.E17@815.24,311.53 v1(830.99,327.28) ; v1(799.5,484.76) U10.K17@815.24,469.01 v1(830.99,484.76) ; v1(799.5,484.76) U10.L17@815.24,500.5 v1(830.99,484.76) ; U10.B17@815.24,217.04 v1(830.99,201.29) ; U10.B17@815.24,217.04 v1(830.99,232.79) ; v1(830.99,201.29) U10.B16@846.74,217.04 ; v1(830.99,232.79) U10.B16@846.74,217.04 ; v1(830.99,232.79) U10.C16@846.74,248.53 v1(862.49,232.79) ; U10.B16@846.74,217.04 v1(862.49,232.79) ; v1(925.48,232.79) U10.B13@941.23,217.04 v1(956.98,232.79) ; v1(925.48,232.79) U10.C13@941.23,248.53 v1(956.98,232.79)
  Top Layer w8: C33.2@163.94,907.41 173.1,898.25 U9.17@202.41,898.25 ; v2@257.53,1186.23 v2@260.31,1186.23 ; v1(1106.48,1079.05) 1122.89,1079.05 1155.35,1111.51 U13.12@1199,1111.51
  Top Layer w10: v2(-244.72,813.07) -205.87,813.07 -199.93,819.01 SW5.2@-199.93,890.17 ; U13.47@746.24,914.66 779.93,914.66 785.62,908.98 v1(787.78,908.98) ; v1(1080.89,898.81) 1100.58,879.12 U13.63@1100.58,816.24 ; U13.18@1100.58,1268.99 1100.58,1223.14 v1(1114.35,1209.36)
  Top Layer w12: v2(-43.97,630.91) C45.1@9.94,630.91 ; v2(844.67,1222.67) U13.31@844.67,1268.99
  Top Layer w25: SW6.1@979,1369.36 v2(979,1409)
  Bottom Layer w5: U3.B2@29.39,1430.39 v1(30.28,1431.28)
  Bottom Layer w8: v2(-61.76,751.76) R4.1@-61.76,793.21 ; C17.2@683.94,1048.08 672.94,1037.08 672.94,1034.58 670.44,1034.58 663.41,1027.56 663.41,926.78 v1(684,906.19) ; C104.1@756.24,933.16 780.38,933.16 787.78,925.76 v1(787.78,908.98) ; U1.1@756.81,1085.92 783.88,1085.92 798.18,1071.62 832.48,1071.62 v1(851.62,1090.77)
  Bottom Layer w10: v2(753.14,1232) 784.56,1200.58 R5.1@784.56,1177.7 ; v1@791.56,746.28 791.56,747.11 794.73,750.28 795.56,750.28 818.79,773.5 C83.1@865,773.5 ; v1(1080.89,898.81) 1081.94,897.77 1081.94,871.92 C98.1@1082.98,870.88 ; v1(1106.48,1079.05) cw(c1112.98,1079.05) 1112.98,1085.54 C102.2@1146,1085.54 ; C102.2@1146,1085.4 C102.2@1146,1085.54 ; C103.1@1188,1085.4 1188,1085.54 C102.2@1146,1085.54 ; C105.1@1199,932.07 1242.07,932.07 v1(1266,956) ; C54.1@1487.57,1279.97 1487.57,1401.84 v1(1502.89,1417.17)
  Bottom Layer w12: R9.1@7.82,1524.78 9.59,1523 C4.2@50,1523 120.94,1523 v2(122.72,1524.78) ; J1.B1/A12@832.98,1335.9 833.17,1335.71 C97.1@833.17,1268.99 ; C97.1@834.98,1268.99 834.98,1235.5 844.67,1225.81 v2(844.67,1222.67)
  Bottom Layer w20: v2(581.02,1299.88) J1.A1/B12@581.02,1335.9
  Bottom Layer w22: v2(-146.57,707.21) U2.2@-100,707.21
  other v1: 287.97,353.7 351.48,353.61 788.56,746.28 404,1418 1495.14,1522.87 1509.16,1539.42
  other v2: 257.37,613.76 296.13,613.76 257.37,651.83 296.13,651.83 257.37,689.91 296.13,689.91 257.31,1105.86 296.08,1105.86 257.31,1143.93 296.08,1143.93 257.31,1182 296.08,1182
  other v3: 242.96,888.41 277.21,888.41 311.46,888.41
GPOUT: R8.1 U3.A1 U13.14 | length 1499.8
  Top Layer w8: v1(1000.47,1137.1) 1140.2,1137.1 1153.98,1150.88 U13.14@1199,1150.88
  Mid Layer 2 w8: v1(-9.02,1450.96) -9.02,1316.34 45.01,1262.31 875.26,1262.31 v1(1000.47,1137.1)
  Bottom Layer w5: R8.1@-31.55,1487.77 -31.55,1453.89 -28.63,1450.96 v1(-9.02,1450.96) U3.A1@10.59,1450.96
GREEN: R61.2 U13.50 | length 1064.4
  Top Layer w8: U13.50@844.67,816.24 844.67,849.62 v1(854.61,859.57) v1@852.88,861.3 ; v1(1624.83,1131.32) 1625.5,1131.32 R61.2@1625.5,1103
  Mid Layer 1 w8: v1(1252.22,1146.6) 1253.39,1147.77 1608.38,1147.77 v1(1624.83,1131.32)
  Bottom Layer w8: v1(854.61,859.57) 854.61,938.81 948.57,1032.77 1210.1,1032.77 1253,1075.67 1253,1145.83 v1(1252.22,1146.6)
"INTERRUPT 2": J4.5 U13.55 | length 604.8
  Top Layer w6: U13.55@943.1,816.24 943.1,788.53 955.84,775.78 1197.64,775.78 v1(1245.63,823.77)
  Mid Layer 2 w10: v1(1245.63,823.77) v1(1381,823.77)
  Bottom Layer w10: v1(1381,823.77) J4.5@1495,823.77
IO_0: U10.M2 U13.41 | length 1088.1
  Top Layer w5: v1(1271.94,516.25) U10.M2@1287.68,532
  Top Layer w10: U13.41@746.24,1032.77 v1(824.98,1032.77)
  Mid Layer 1 w8: v1(824.98,1032.77) 1250.79,1032.77 1315.43,968.13 1315.43,559.75 v1(1271.94,516.25)
IO_1: U10.L3 U13.42 | length 1104.3
  Top Layer w5: v1(1240.44,484.99) 1240.56,484.99 1256.07,500.5 U10.L3@1256.19,500.5
  Top Layer w10: U13.42@746.24,1013.09 811.21,1013.09 v1(824.98,999.31)
  Mid Layer 1 w8: v1(824.98,999.31) 1267.28,999.31 1303.43,963.16 1303.43,579.24 1253.79,529.6 1253.79,501.05 1240.44,487.7 v1(1240.44,484.99)
IO_2: U10.K3 U13.43 | length 1240
  Top Layer w5: U10.K3@1256.19,469.01 1256.19,469.13 1271.94,484.87 v1(1271.94,484.99)
  Top Layer w10: U13.43@746.24,993.4 783.88,993.4 808.05,969.23 v1(829.31,969.23)
  Mid Layer 1 w8: v1(850.58,1059.83) 1242.43,1059.83 1327.43,974.83 1327.43,540.25 1272.18,484.99 v1(1271.94,484.99)
  Bottom Layer w10: v1(829.31,969.23) 849.94,989.86 849.94,1059.2 v1(850.58,1059.83)
LATCH/SP_EN: C16.2 R12.1 R39.2 U4.9 U6.1 U7.3 | length 1931.8
  Top Layer w8: v1(-125.76,858.27) -125.76,1074.61 -115.79,1084.58 v1(-115.79,1190.11)
  Mid Layer 2 w8: v1(-125.76,858.27) -125.76,285.94 -63.82,224.01 v1(160.31,224.01)
  Bottom Layer w8: U6.1@-115.79,1289.39 v1(-115.79,1190.11) -115.79,1158.12 -93.05,1135.38 U4.9@-39.15,1135.38 ; v1(160.31,224.01) 162.23,225.92 222.52,225.92 268.29,271.69 U7.3@268.29,340.9
  Bottom Layer w12: v1(-125.76,858.27) -72.9,858.27 71.66,713.71 71.66,710.21 R12.1@74.66,707.21 74.87,707 R39.2@107,707
MCU_RST: C109.2 SW7.1 U13.7 | length 698.4
  Top Layer w8: U13.7@1199,1013.09 1229.54,1013.09 1234.22,1017.77 1234.22,1275.22 1266.19,1307.19 1401.52,1307.19 1437.86,1343.54 1437.86,1440 SW7.1@1437.86,1515.4
MOTOR: R11.2 U13.27 | length 315.1
  Top Layer w8: U13.27@923.41,1268.99 v1(923.41,1308.28)
  Mid Layer 1 w10: v1@926.91,1308.78 1043.25,1308.78 v1(1143.02,1209.01)
  Bottom Layer w10: v1(1143.02,1209.01) R11.2@1143.02,1227.39
NetC6_2: C6.2 U3.B3 | length 91.6
  Bottom Layer w5: C6.2@-29.08,1373.54 20.32,1373.54 30.28,1383.5 U3.B3@30.28,1411.59
NetC10_2: C10.2 U4.6 | length 43.5
  Bottom Layer w5: C10.2@-39.15,1032.85 U4.6@-39.15,1076.33
NetC13_1: C13.1 U5.15 | length 46.2
  Bottom Layer w5: U5.15@526.27,1084.64 526.35,1084.64 C13.1@526.35,1130.74
NetC13_2: C13.2 L2.1 U5.13 U5.14
NetC15_1: C15.1 U5.16 | length 66.2
  Bottom Layer w5: U5.16@545.95,1084.64 567.6,1084.64 573.51,1090.55 C15.1@573.51,1126.74
NetC93_1: C93.1 U13.3 X2.1 | length 159.6
  Top Layer w8: U13.3@1199,934.35 1199.1,934.44 1231.1,934.44 1235.79,929.75 1235.79,860.1 1240.48,855.41 X2.1@1285,855.41
NetC94_1: C94.1 U13.4 X2.2 | length 179.4
  Top Layer w8: U13.4@1199,954.03 1237.22,954.03 1248.32,942.94 1248.32,906.59 1256.19,898.72 X2.2@1285,898.72 1333,898.72 C94.1@1333,897.56
NetC100_2: C100.2 J1.S1 J1.S2 J1.S3 J1.S4 R43.2
NetC101_2: C101.2 U13.5 X3.1 | length 200.5
  Top Layer w8: U13.5@1199,973.72 1245.63,973.72 1269.32,997.4 1330.1,997.4 1369.47,958.03 X3.1@1369.47,954.09
NetC106_2: C106.2 U13.6 X3.3 | length 135.4
  Top Layer w8: U13.6@1199,993.4 1240.5,993.4 1261.55,1014.45 1261.55,1035.35 1266.91,1040.71 X3.3@1302.54,1040.71